# Altium PCB IoT-Button-PCB.PcbDoc (part 1 of 2)
Units mm, origin at the board's own origin, x right, y up, seen from the top; angles counter-clockwise.
Board outline 90 x 83 mm, 2 copper layers (Top Layer, Bottom Layer), stack 1.17 mm thick; 63 components, 30 nets, 232 pads, 64 vias.
Unrouted connection lines stored in the file: 71.
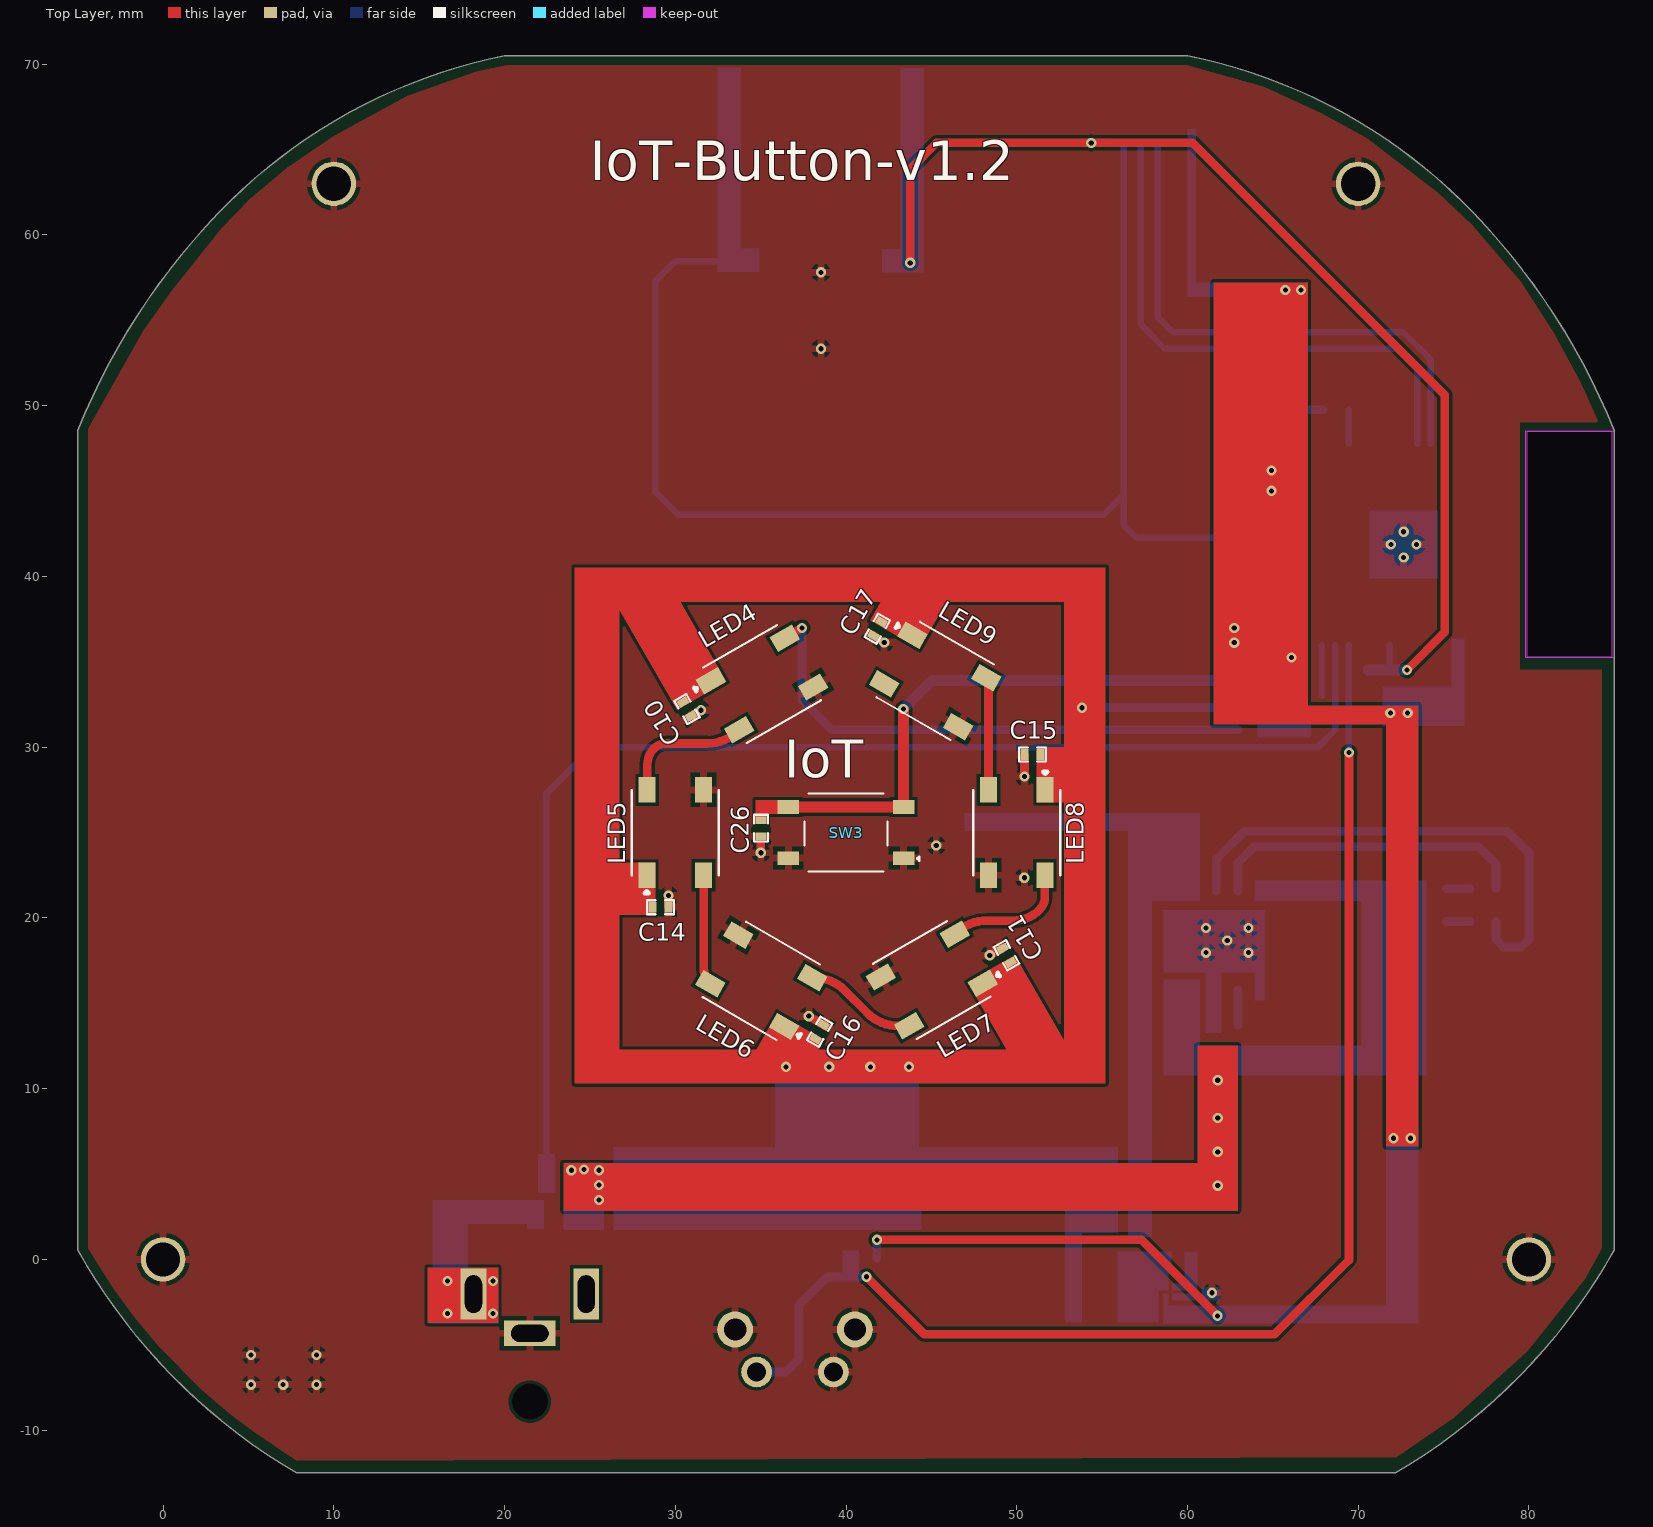
[diagram p0: Top Layer view]
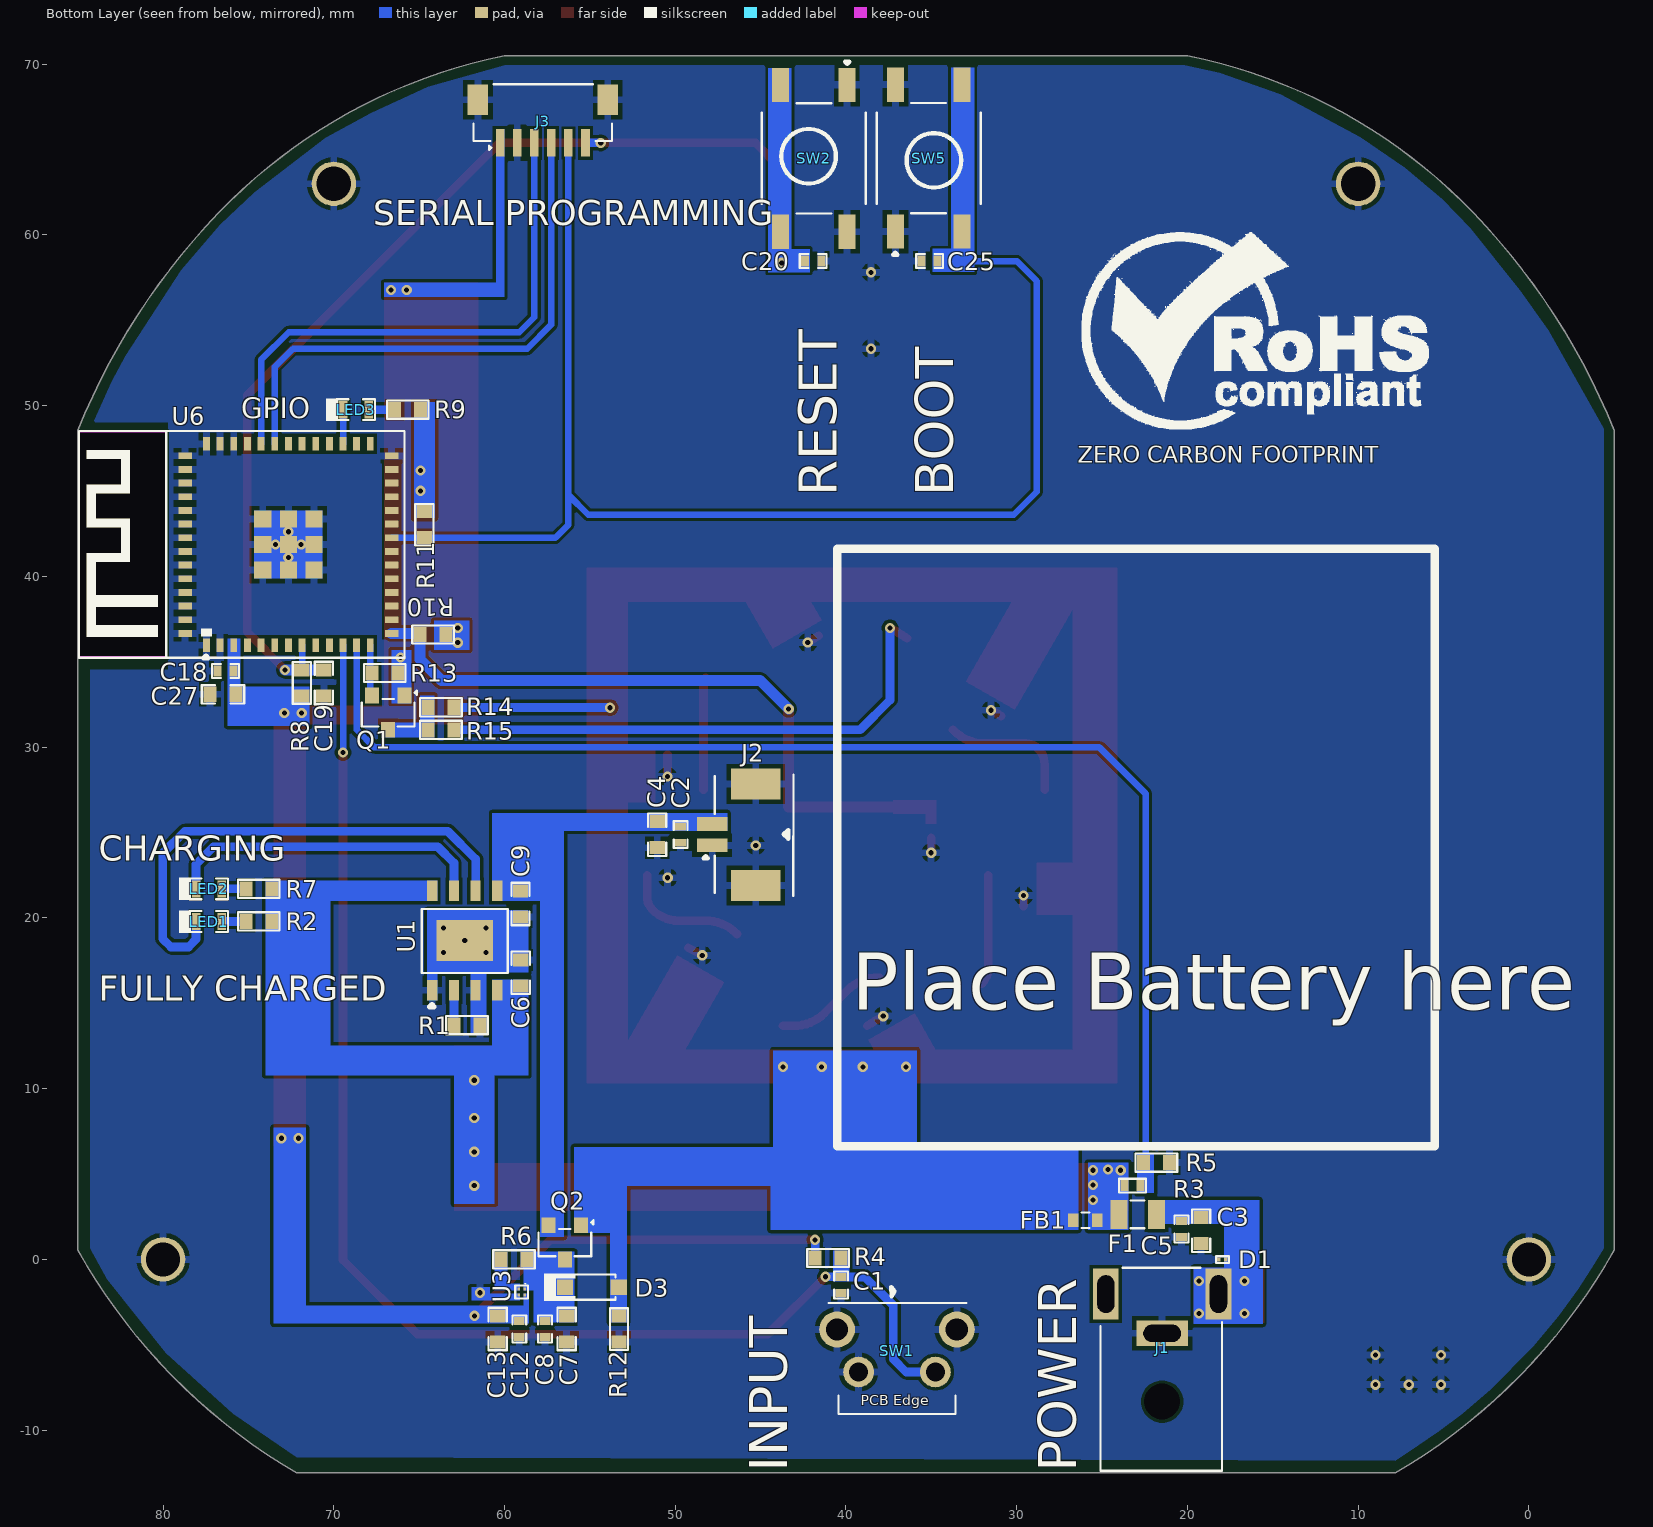
[diagram p1: Bottom Layer view, seen from below]
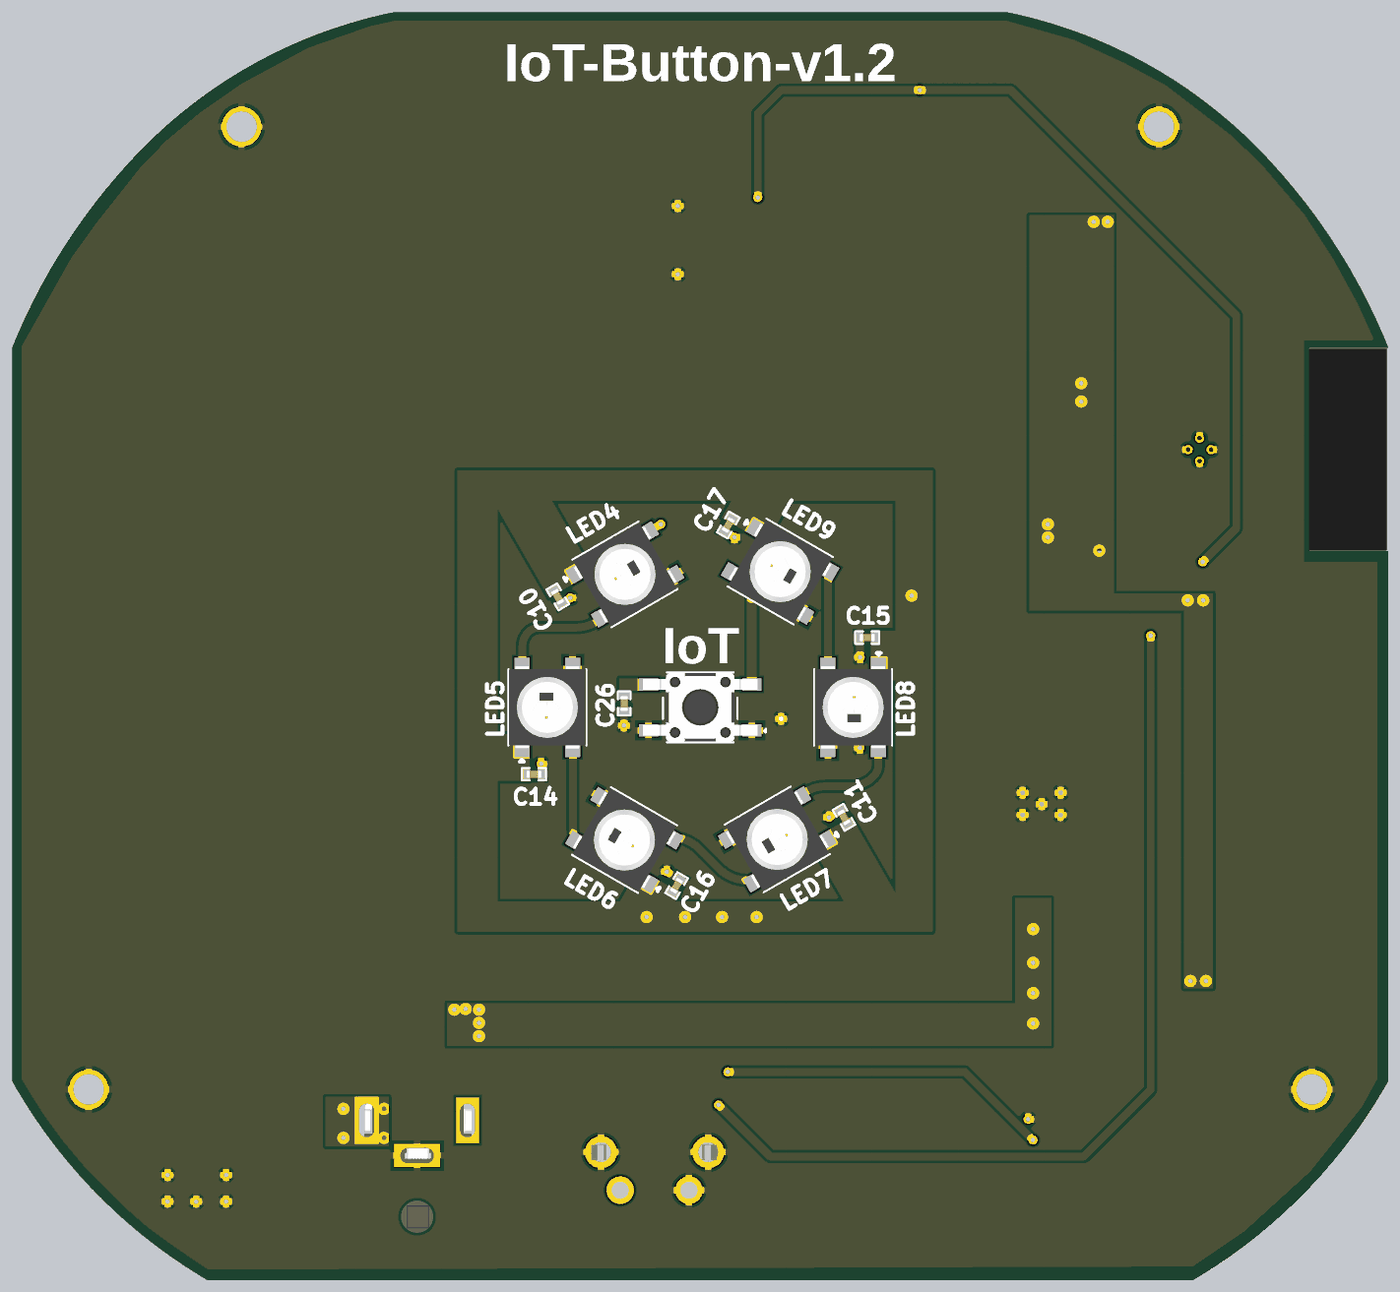
[diagram p2: 3D render of the assembled board from above, using the file's embedded part models]
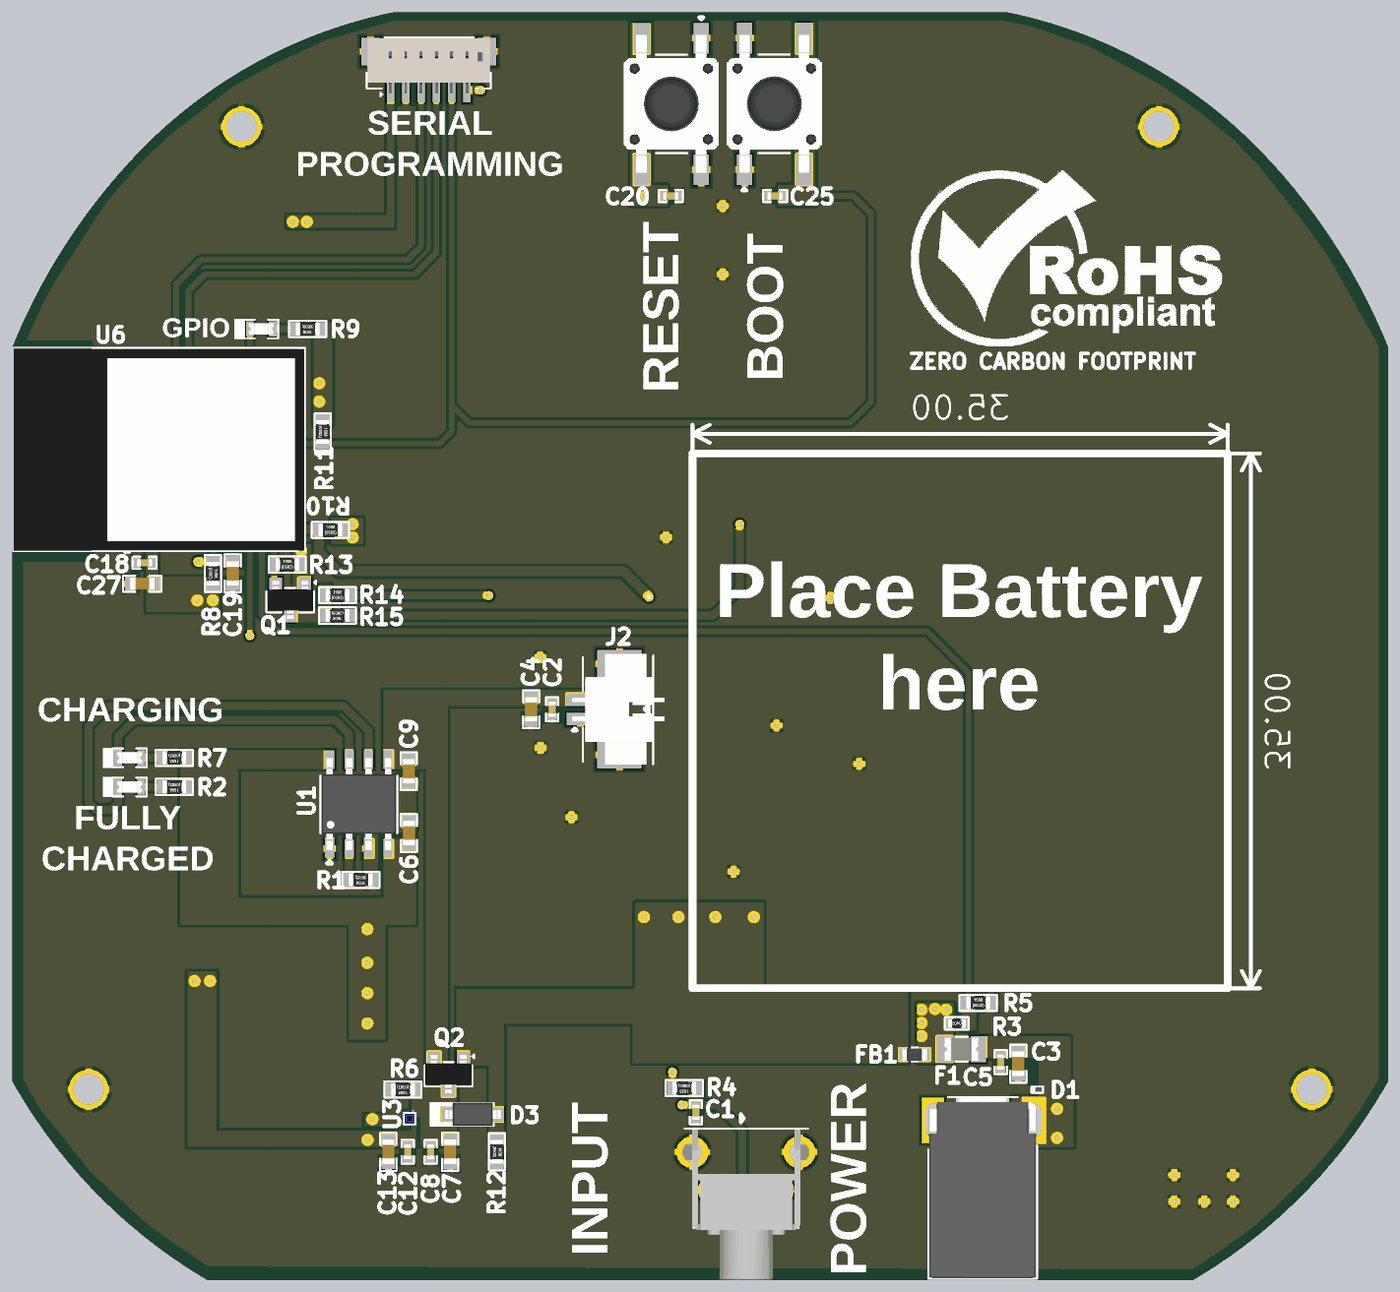
[diagram p3: 3D render of the assembled board from below, using the file's embedded part models]

## Layer stack, top to bottom
Top Solder: solder mask 0.01, Solder Resist, Dk 3.5
Top Layer: signal copper 0.035
Dielectric 1: dielectric 1.1, FR-4, Dk 4.8
Bottom Layer: signal copper 0.035
Bottom Solder: solder mask 0.01, Solder Resist, Dk 3.5

## Board outline
7.805,-12.5 cw(c25.512,17.69) -5,0.544 -5,48.544 cw(c32.1,33.591) 3.25,61.298 cw(c26.33,39.132) 20,70.5 60,70.5 cw(c53.67,39.132) 76.75,61.298 cw(c47.9,33.591) 85,48.544 85,0.544 cw(c54.488,17.69) 72.195,-12.5
cut-out: 79.812,35.224 79.812,48.535 85,48.544 85,35.235

## Design rules (kind name [scope] priority, off if disabled: settings)
Clearance [All] p1: gap=0.178 ignorepadtopadclearanceinfootprint=FALSE
HoleToHoleClearance [All] p1: gap=0.127 allowstackedmicrovias=TRUE
MinimumSolderMaskSliver [All] p1: minsoldermaskwidth=0
PolygonConnect [All] p1: connectstyle=Relief reliefconductorwidth=0.432 reliefentries=4 polygonreliefangle="90 Angle" airgapwidth=0.254
RoutingVias [All] p1: holewidth=0.3 width=0.6 viastyle="Through Hole" minholewidth=0.3 minwidth=0.6 maxholewidth=0.3 maxwidth=0.6
SilkToSilkClearance [All] p1: silktosilkclearance=0.051
SilkToSolderMaskClearance [IsPad] p1: minsilkscreentomaskgap=0 clearancetoexposedcopper=TRUE
SolderMaskExpansion [All] p1: expansion=0.102 istentingtop=FALSE
UnRoutedNet [All] p1: checkbadconnections=TRUE
Width [All] p1: maxlimit=1.2 minlimit=0.254 preferedwidth=0.508 minimp=50.000000 maximp=50.000000 favimp=50.000000
25 further rules are at their usual default settings.

## Classes and differential pairs
component class U_Power-Section: C2 C3 C4 C5 C6 C7 C8 C9 C12 C13 D1 D3 F1 FB1 J1 J2 LED1 LED2 Q2 R1 R2 R3 R5 R6 R7 R12 U1 U3
component class U_LEDS: C10 C11 C14 C15 C16 C17 LED4 LED5 LED6 LED7 LED8 LED9 Q1 R13 R14 R15
component class U_Controller-Section: C1 C18 C19 C20 C25 C26 C27 J3 LED3 R4 R8 R9 R10 R11 SW1 SW2 SW3 SW5 U6

## Components (designator, comment, footprint, x,y, rotation, side; value= is the part's Value field where it differs from the comment)
C1 "100nF" Cap-0402 40.284,-1.499 r90 bottom
C2 "100nF" Cap-0402 49.686,24.873 r90 bottom locked
C3 "1uF" Cap-0603 19.201,1.683 r90 bottom
C4 "1uF" Cap-0603 51.058,24.873 r90 bottom locked
C5 "100nF" Cap-0402 20.345,1.783 r90 bottom
C6 "10uF" Cap-0603 59.051,16.78 r270 bottom locked
C7 "1uF" Cap-0603 56.361,-4.083 r90 bottom locked
C8 "100nF" Cap-0402 57.631,-4.083 r90 bottom locked
C9 "10uF" Cap-0603 59.068,20.817 r90 bottom locked
C10 "100nF" Cap-0402 30.683,32.233 r120 top
C11 "100nF" Cap-0402 49.403,17.805 r300 top
C12 "100nF" Cap-0402 59.137,-4.082 r90 bottom locked
C13 "1uF" Cap-0603 60.4,-4.082 r90 bottom locked
C14 "100nF" Cap-0402 29.129,20.625 r180 top locked
C15 "100nF" Cap-0402 50.926,29.566 r0 top
C16 "100nF" Cap-0402 38.456,13.335 r240 top
C17 "100nF" Cap-0402 41.837,36.936 r60 top
C18 "100nF" Cap-0402 76.338,34.462 r180 bottom locked
C19 "1uF" Cap-0603 70.585,33.763 r270 bottom locked
C20 "100nF" Cap-0402 41.923,58.471 r0 bottom
C25 "100nF" Cap-0402 35.103,58.471 r180 bottom
C26 "100nF" Cap-0402 35.025,25.254 r90 top locked
C27 "1uF" Cap-0603 76.493,33.097 r180 bottom locked
D1 "PESD5V0H1BSFYL" DSN0603-2 17.957,-0.019 r180 bottom locked
D3 "MBR120VLSFT3G" SOD-123 54.881,-1.627 r0 bottom locked
F1 "BSMD0805L-200" Fuse-0805 22.914,2.633 r0 bottom locked
FB1 "BLM18SG121TN1D" "IND-0603 (1608 Metric)" 25.984,2.286 r180 bottom
J1 "DC-0360-2.5" DC-0360-2.5 21.481,-4.331 r90 bottom locked
J2 "1.25-2PWB" 1.25-2PWB 46.562,24.873 r90 bottom locked
J3 "Voltlink Target" "Voltlink Target" 57.758,66.656 r180 bottom locked
LED1 "Emerald" LED-0603 77.318,19.787 r0 bottom locked
LED2 "RED" LED-0603 77.318,21.698 r0 bottom locked
LED3 "White" LED-0603 68.712,49.765 r0 bottom locked
LED4 "WS2812B-XF02/W" WS2812B-XF02/W 35.078,33.705 r30 top
LED5 "WS2812B-XF02/W" WS2812B-XF02/W 30,25 r90 top locked
LED6 "WS2812B-XF02/W" WS2812B-XF02/W 35.041,16.316 r150 top
LED7 "WS2812B-XF02/W" WS2812B-XF02/W 45.033,16.359 r210 top
LED8 "WS2812B-XF02/W" WS2812B-XF02/W 50,25 r270 top locked
LED9 "WS2812B-XF02/W" WS2812B-XF02/W 45.227,33.882 r330 top
Q1 "Si2302CDS" Sot-23 66.819,32.026 r0 bottom
Q2 "AO3401" SOT-23 56.468,0.997 r0 bottom locked
R1 "10K" Res-0603 62.203,13.715 r180 bottom locked
R2 "220R" Res-0603 74.395,19.793 r180 bottom locked
R3 "56k" Res-0402 23.216,4.318 r0 bottom value=56kR
R4 "10K" Res-0603 41.046,0.076 r180 bottom
R5 "100K" Res-0603 21.819,5.664 r0 bottom
R6 "10K" Res-0603 59.445,-0.004 r180 bottom locked
R7 "330R" Res-0603 74.395,21.698 r180 bottom locked
R8 "10K" Res-0603 71.876,33.763 r90 bottom locked
R9 "51R" Res-0603 65.674,49.765 r180 bottom locked
R10 "10K" Res-0603 64.186,36.601 r0 bottom
R11 "DNP" Res-0603 64.693,43.029 r90 bottom locked
R12 "100K" RES-0603 53.293,-4.083 r90 bottom locked
R13 "10K" Res-0603 67.012,34.347 r0 bottom
R14 "10K" Res-0603 63.729,32.338 r0 bottom
R15 "1K" Res-0603 63.729,31.013 r180 bottom
SW1 "1825027-8" 1825027-8 37.013,-5.353 r180 bottom locked
SW2 "K2-6639SP-C4SC-04" K2-6639SP-C4SC-04 41.89,64.49 r270 bottom locked
SW3 "GT-TC074E-H080-L1" GT-TC074E-H080-L1 40,25 r180 top locked
SW5 "K2-6639SP-C4SC-04" K2-6639SP-C4SC-04 35.152,64.497 r90 bottom locked
U1 "TP4056-42-ESOP8" ESOP-8 62.33,18.67 r90 bottom locked
U3 "TPS7A2133PYWDJ" "4-WCSP (0.63x0.63)" 59.008,-1.924 r270 bottom locked
U6 "ESP32-MINI-1-N4" ESP32-MINI-1-N4 72.662,41.867 r90 bottom locked

## Footprints (in the part's own frame and the unit in brackets; to place one, negate y for a bottom-side part, rotate by r counter-clockwise, add the part's x,y. Pads: shape width x height; smd on the part's side, far side on the other; paste and mask are expansions set on the pad)
1.25-2PWB [mm]
  rect 0.8x1.8 smd: 1(-0.625,1.275) 2(0.625,1.275)
  rect 1.8x2.9 smd: MP1(-2.975,-1.275) MP2(2.975,-1.275)
  silkscreen extent -3.6,-3.48 3.52,1.78, body extent -3.62,-4.24 3.62,1.81, height 3.5
"4-WCSP (0.63x0.63)" [mm]
  rect 0.165x0.165 smd: A1(-0.192,0.193) A2(0.158,0.193) B1(-0.192,-0.157) B2(0.158,-0.157)
  silkscreen extent -0.54,-0.37 0.36,0.39, body extent -0.32,-0.32 0.32,0.32, height 0.43
1825027-8 [mm]
  round 1.8 hole 1.1: 1(-2.25,-1.245) 2(2.25,-1.245)
  round 2.1 hole 1.3: 3(3.505,1.245) 4(-3.505,1.245)
  silkscreen extent -4.01,-3.71 4.06,2.79, body extent -4.18,-7.11 4.23,2.73, height 8
Cap-0402 [mil]
  rect 18x25 smd mask+2.36: 1(-18.5,0) 2(18.5,0)
  silkscreen extent -31,-16 31,16, body extent -20,-10 20,10, height 19
Cap-0603 [mil]
  rect 30x35 smd mask+2.36: 1(-30,0) 2(30,0)
  silkscreen extent -49,-21 49,21, body extent -32,-16 31,16, height 34
DC-0360-2.5 [mm]
  rect 1.5x3 hole 1 slot 2.2 at 90 deg mask+0.05: 2(0,0)
  rect 3x1.5 hole 1 slot 2.2 at 0 deg mask+0.05: 3(2.3,3.3) 4(2.3,-3.3)
  round 0 hole 2.1 unplated mask+0.05: MH(-4,0)
  silkscreen extent -8.05,-3.51 3.84,3.61, body extent -8.01,-3.45 3.79,3.56, height 9.65
DSN0603-2 [mm]
  rect 0.2x0.24 smd mask+0.055: 1(-0.2,0) 2(0.2,0)
  silkscreen extent -0.38,-0.2 0.38,0.2, body extent -0.3,-0.15 0.3,0.15, height 0.32
ESOP-8 [mm]
  rect 1.2x0.6 smd: 1(-2.909,1.905) 2(-2.909,0.635) 3(-2.909,-0.635) 4(-2.909,-1.905) 5(2.909,-1.905) 6(2.909,-0.635) 7(2.909,0.635) 8(2.909,1.905)
  rect 2.4x3.3 smd: 9(0,0)
  silkscreen extent -3.88,-2.51 1.85,2.51, body extent -3,-2.45 3,2.45, height 1.75
ESP32-MINI-1-N4 [mm]
  rect 0.8x0.4 smd: 1(-5.9,4.8) 2(-5.9,4) 3(-5.9,3.2) 4(-5.9,2.4) 5(-5.9,1.6) 6(-5.9,0.8) 7(-5.9,0) 8(-5.9,-0.8) 9(-5.9,-1.6) 10(-5.9,-2.4) 11(-5.9,-3.2) 12(-5.9,-4) 13(-5.9,-4.8) 28(5.9,-4.8) 29(5.9,-4) 30(5.9,-3.2) 31(5.9,-2.4) 32(5.9,-1.6) 33(5.9,-0.8) 34(5.9,0) 35(5.9,0.8) 36(5.9,1.6) 37(5.9,2.4) 38(5.9,3.2) 39(5.9,4) 40(5.9,4.8)
  rect 0.4x0.8 smd: 14(-5.2,-6.05) 15(-4.4,-6.05) 16(-3.6,-6.05) 17(-2.8,-6.05) 18(-2,-6.05) 19(-1.2,-6.05) 20(-0.4,-6.05) 21(0.4,-6.05) 22(1.2,-6.05) 23(2,-6.05) 24(2.8,-6.05) 25(3.6,-6.05) 26(4.4,-6.05) 27(5.2,-6.05) 41(5.2,6.05) 42(4.4,6.05) 43(3.6,6.05) 44(2.8,6.05) 45(2,6.05) 46(1.2,6.05) 47(0.4,6.05) 48(-0.4,6.05) 49(-1.2,6.05) 50(-2,6.05) 51(-2.8,6.05) 52(-3.6,6.05) 53(-4.4,6.05) 54(-5.2,6.05)
  rect 1x1 smd: 55(-1.5,1.5) 56(0,1.5) 57(1.5,1.5) 58(-1.5,0) 59(0,0) 60(1.5,0) 61(-1.5,-1.5) 62(0,-1.5) 63(1.5,-1.5)
  Keep-Out Layer region: -6.579,12.217 6.604,12.217 6.604,7.213 -6.579,7.213
  silkscreen extent -6.65,-6.81 6.65,12.27, body extent -6.6,-6.76 6.6,12.24, height 3.25
Fuse-0805 [mm]
  rect 1x1.7 smd: 1(-1.1,0) 2(1.1,0)
  silkscreen extent -0.41,-0.81 0.41,0.81, body extent -1.1,-0.75 1.1,0.75, height 1.24
GT-TC074E-H080-L1 [mm]
  rect 1.25x0.8 smd: 1(-3.375,1.5) 2(3.375,1.5) 3(-3.375,-1.5) 4(3.375,-1.5)
  silkscreen extent -4.29,-2.29 2.44,2.29, body extent -3.75,-2.25 3.75,2.25, height 8
"IND-0603 (1608 Metric)" [mm] "0.063\" L x 0.032\" W (1.60mm x 0.80mm)"
  rect 0.6x0.8 smd: 1(-0.7,0) 2(0.7,0)
  silkscreen extent -0.2,-0.46 0.23,0.46, body extent -0.8,-0.4 0.8,0.4, height 0.78
K2-6639SP-C4SC-04 [mm]
  rect 2x1 smd: 1(-4.3,1.95) 2(4.3,1.95) 3(-4.3,-1.95) 4(4.3,-1.95)
  silkscreen extent -5.66,-3.05 3.23,3.05, body extent -4.5,-3 4.5,3, height 5
LED-0603 [mm]
  rect 0.5x1 smd: 1(-0.75,0) 2(0.75,0)
  silkscreen extent -1.12,-0.66 1.75,0.66, body extent -0.82,-0.37 0.82,0.36, height 0.68
Res-0402 [mil]
  rect 18x25 smd mask+2.17: 1(-18.5,0) 2(18.5,0)
  silkscreen extent -32,-17 32,16, body extent -23,-11 23,11, height 16
Res-0603 [mil]
  rect 30x35 smd: 1(-30,0) 2(30,0)
  silkscreen extent -48,-21 48,21, body extent -31,-17 31,17, height 18
RES-0603 [mil]
  rect 30x35 smd: 1(-30,0) 2(30,0)
  silkscreen extent -48,-21 48,21, body extent -31,-17 31,17, height 18
SOD-123 [mm]
  rect 0.95x0.9 smd: 1(-1.575,0) 2(1.575,0)
  silkscreen extent -1.37,-0.8 2.82,0.8, body extent -1.82,-0.77 1.83,0.78, height 1.5
Sot-23 [mm] "TRANS NPN 40V 0.6A SOT23"
  rect 0.82x0.92 smd: 1(-0.95,-1) 2(0.95,-1) 3(0,1)
  silkscreen extent -1.68,-1.3 1.55,0.81, body extent -1.5,-1.25 1.5,1.25, height 1.05
SOT-23 [mm] "TRANS NPN 40V 0.6A SOT23"
  rect 0.82x0.92 smd: 1(-0.95,-1) 2(0.95,-1) 3(0,1)
  silkscreen extent -1.68,-1.3 1.55,0.81, body extent -1.5,-1.25 1.5,1.25, height 1.05
"Voltlink Target" [mm]
  rect 0.5x1.6 smd: 1(-2.5,-1.262) 2(-1.5,-1.262) 3(-0.5,-1.262) 4(0.5,-1.262) 5(1.5,-1.262) 6(2.5,-1.262)
  rect 1.2x1.8 smd: MP1(-3.8,1.262) MP2(3.8,1.262)
  silkscreen extent -4.06,-1.68 4.06,2.17, body extent -4,-1.49 4,2.11, height 4.25
WS2812B-XF02/W [mm]
  rect 1.5x1 smd: 1(-2.5,1.65) 2(-2.5,-1.65) 3(2.5,-1.65) 4(2.5,1.65)
  silkscreen extent -3.56,-2.55 2.5,2.55, body extent -2.7,-2.5 2.7,2.5, height 1.55

## Part data
C1 C2 C5 C8 C10 C11 C12 C14 C15 C16 C17 C18 C20 C25 C26: library part CC0402KRX5R8BB104, "CAP CER 0.1UF 25V X5R 0402", Case Code (Imperial)=0402, Case Code (Metric)=1005, Dielectric=X5R, LCSC Part Number=C106256, Manufacturer=Yageo, Max Operating Temperature=85°C, Min Operating Temperature=-55°C, Resistor Type=Ceramic, Supplier Part Number 1=311-1697-1-ND, Tolerance=10%, Voltage Rating=25V, Capacitance=100nF, Case/Package=0402, Category="Ceramic Capacitors", ComponentLink1Description=http://www.mouser.com/ds/2/447/UPY-GPHC_X5R_4V-to-50V_25-1131599.pdf?src-supplier=Mouser, ComponentLink1URL=http://www.mouser.com/ds/2/447/UPY-GPHC_X5R_4V-to-50V_25-1131599.pdf?src-supplier=Mouser, ComponentLink2Description=http://www.yageo.com/documents/recent/UPY-GPHC_X5R_4V-to-50V-16.pdf?src-supplier=Future+Electronics, ComponentLink2URL=http://www.yageo.com/documents/recent/UPY-GPHC_X5R_4V-to-50V-16.pdf?src-supplier=Future+Electronics, ComponentLink3Description=http://www.yageo.com/documents/recent/UPY-GPHC_X5R_4V-to-50V_25.pdf?src-supplier=Digi-Key, ComponentLink3URL=http://www.yageo.com/documents/recent/UPY-GPHC_X5R_4V-to-50V_25.pdf?src-supplier=Digi-Key, Depth=0.5mm, Halogen Free="Halogen Free", Item Type=Capacitor, Lead Free="Lead Free", Length=0.039inch, Manufacturer Part Number=CC0402KRX5R8BB104, Mount="Surface Mount", Packaging="Tape and Reel", Pricing 1="1=0.10000, 10=0.03800, 50=0.02100, 100=0.01710, 500=0.01224, 1000=0.00961, 2500=0.00874, 5000=0.00804 (USD)", RoHS=Yes, RoHS Compliant=Yes, Series=CC, Stock 1=4598218, Supplier 1=Digi-Key, Thickness=0.022inch, Voltage Rating (DC)=25V, Width=0.02inch
C3 C4 C7 C13 C19 C27: library part CC0603KRX5R8BB105, "CAP CER 1UF 25V X5R 0603", Case Code (Imperial)=0603, Case Code (Metric)=1608, Dielectric=X5R, LCSC Part Number=C14664, Manufacturer=Yageo, Max Operating Temperature=85°C, Min Operating Temperature=-55°C, Package Quantity=1, Supplier Part Number 1=311-1445-1-ND, Tolerance=10%, Voltage Rating=25V, Capacitance=1uF, Case/Package=0603, Category="Ceramic Capacitors", ComponentLink1Description=https://datasheet.ciiva.com/176/mlccorderingcode-176785.pdf?src-supplier=Digi-Key, ComponentLink1URL=https://datasheet.ciiva.com/176/mlccorderingcode-176785.pdf?src-supplier=Digi-Key, ComponentLink2Description=https://datasheet.ciiva.com/176/mlccorderingcode-176786.pdf?src-supplier=Digi-Key, ComponentLink2URL=https://datasheet.ciiva.com/176/mlccorderingcode-176786.pdf?src-supplier=Digi-Key, ComponentLink3Description=https://datasheet.ciiva.com/176/mlccorderingcode-176787.pdf?src-supplier=Digi-Key, ComponentLink3URL=https://datasheet.ciiva.com/176/mlccorderingcode-176787.pdf?src-supplier=Digi-Key, ComponentLink4Description=https://datasheet.ciiva.com/17436/upy-gphc-x5r-4v-to-50v-12-17436952.pdf?src-supplier=Avnet+Europe, ComponentLink4URL=https://datasheet.ciiva.com/17436/upy-gphc-x5r-4v-to-50v-12-17436952.pdf?src-supplier=Avnet+Europe, ComponentLink5Description=https://datasheet.ciiva.com/7978/1525783-7978171.pdf?src-supplier=Element14, ComponentLink5URL=https://datasheet.ciiva.com/7978/1525783-7978171.pdf?src-supplier=Element14, ComponentLink6Description=https://datasheet.ciiva.com/11586/upy-gphc-x5r-4v-to-50v-12-11586318.pdf?src-supplier=Avnet, ComponentLink6URL=https://datasheet.ciiva.com/11586/upy-gphc-x5r-4v-to-50v-12-11586318.pdf?src-supplier=Avnet, Construction=Flat, Depth=0.8mm, Halogen Free="Halogen Free", Height=0.8mm, Lead Free="Lead Free", Length=1.6mm, Manufacturer Part Number=CC0603KRX5R8BB105, Mount="Surface Mount", Number of Pins=2, Packaging="Tape and Reel", Pricing 1="1=0.12000, 10=0.08400, 50=0.04760, 100=0.03940, 500=0.02764, 1000=0.02288 (USD)", Radiation Hardening=No, REACH SVHC="No SVHC", RoHS=Yes, RoHS Compliant=Yes, Series=CC, Stock 1=919939, Supplier 1=Digi-Key, Termination=SMD/SMT, Thickness=0.035inch, Voltage Rating (DC)=25V, Width=0.031inch
  C3 C4 C7 C13: Item Type=Capacitor
C6 C9: library part CC0603KRX5R7BB106, "CAP CER 10UF 16V X5R 0603", Case Code (Imperial)=0603, Case Code (Metric)=1608, LCSC Part Number=C2936601, Manufacturer=Yageo, Max Operating Temperature=85°C, Min Operating Temperature=-55°C, Supplier Part Number 1=311-3486-1-ND, Tolerance=10%, Voltage Rating=16V, Capacitance=10uF, Case/Package=0603, Category="Ceramic Capacitors", ComponentLink1Description=http://www.yageo.com/documents/recent/UPY-GPHC_X5R_4V-to-50V_25.pdf?src-supplier=Digi-Key, ComponentLink1URL=http://www.yageo.com/documents/recent/UPY-GPHC_X5R_4V-to-50V_25.pdf?src-supplier=Digi-Key, Item Type=Capacitor, Manufacturer Part Number=CC0603KRX5R7BB106, Mount="Surface Mount", Packaging="Cut Tape", Pricing 1="1=0.68000, 10=0.48000, 50=0.36300, 100=0.31610, 500=0.23416, 1000=0.19903 (USD)", RoHS=Yes, RoHS Compliant=Yes, Stock 1=240725, Supplier 1=Digi-Key
D1: "TVS DIODE 5VWM 6.3VC DSN0603-2", LCSC Part Number=C477989, Manufacturer=Nexperia, Category="ESD and Circuit Protection ICs", ComponentLink1Description=http://www.farnell.com/datasheets/1961312.pdf?src-supplier=Farnell, ComponentLink1URL=http://www.farnell.com/datasheets/1961312.pdf?src-supplier=Farnell, ComponentLink2Description=https://assets.nexperia.com/documents/data-sheet/PESD5V0H1BSF.pdf?src-supplier=Digi-Key, ComponentLink2URL=https://assets.nexperia.com/documents/data-sheet/PESD5V0H1BSF.pdf?src-supplier=Digi-Key, ComponentLink3Description=http://www.farnell.com/datasheets/1961312.pdf?src-supplier=Newark, ComponentLink3URL=http://www.farnell.com/datasheets/1961312.pdf?src-supplier=Newark, Item Type=Diode, Manufacturer Part Number=PESD5V0H1BSFYL, Pricing 1="18000=0.06453, 36000=0.06278, 54000=0.06104, 90000=0.05930, 180000=0.05755, 900000=0.05581, 1800000=0.05406 (USD)", RoHS=Yes, RoHS Compliant=Yes, Stock 1=9000, Supplier 1=Avnet, Supplier Part Number 1=PESD5V0H1BSFYL
D3: "DIODE SCHOTTKY 20V 1A SOD123FL", Average Rectified Current=1A, Forward Voltage=340mV, LCSC Part Number=C295749, Manufacturer="ON Semiconductor", Max Forward Surge Current (Ifsm)=45A, Max Operating Temperature=125°C, Max Repetitive Reverse Voltage (Vrrm)=20V, Max Reverse Leakage Current=600uA, Min Operating Temperature=-65°C, Package Quantity=10000, Supplier Part Number 1=MBR120VLSFT3GOSCT-ND, ComponentLink1Description=http://www.mouser.com/ds/2/308/MBR120VLSFT1-D-107081.pdf?src-supplier=Mouser, ComponentLink1URL=http://www.mouser.com/ds/2/308/MBR120VLSFT1-D-107081.pdf?src-supplier=Mouser, ComponentLink2Description=http://www.onsemi.com/pub/Collateral/MBR120VLSFT1-D.PDF?src-supplier=Digi-Key, ComponentLink2URL=http://www.onsemi.com/pub/Collateral/MBR120VLSFT1-D.PDF?src-supplier=Digi-Key, ComponentLink3Description=http://www.onsemi.cn/pub_link/Collateral/MBR120VLSFT1-D.PDF?src-supplier=Avnet, ComponentLink3URL=http://www.onsemi.cn/pub_link/Collateral/MBR120VLSFT1-D.PDF?src-supplier=Avnet, Current Rating=1A, Element Configuration=Single, Forward Current=1A, Halogen Free="Halogen Free", Lead Free="Lead Free", Manufacturer Part Number=MBR120VLSFT3G, Max Reverse Voltage (DC)=20V, Max Surge Current=45A, Number of Pins=2, Output Current=1A, Packaging="Tape and Reel", Peak Non-Repetitive Surge Current=45A, Peak Reverse Current=600uA, Polarity=Standard, Pricing 1="1=0.42, 10=0.338, 100=0.2298, 500=0.17234, 1000=0.12926 (USD)", Radiation Hardening=No, REACH SVHC="No SVHC", Stock 1=130499, Supplier 1=Digi-Key, Voltage Rating (DC)=20V
F1: "6V 2A 50A 1W -40℃~+85℃ 4A 4mΩ 5s 45mΩ 0805 Resettable Fuses ROHS", LCSC Part Number=C2757931, Manufacturer=BHFUSE, Package=0805, ComponentLink1Description=LCSC, ComponentLink1URL=https://www.lcsc.com/product-detail/Resettable-Fuses_BHFUSE-BSMD0805L-200_C2757931.html, Item Type=Fuse, Manufacturer Part Number=BSMD0805L-200
FB1: "FERRITE BEAD 120 OHM 0603 1LN", Case Code (Imperial)=0603, Case Code (Metric)=1608, Current Rating=3A, DC Resistance (DCR)=25mR, Frequency=100MHz, LCSC Part Number=C113030, Manufacturer=Murata, Max Operating Temperature=125°C, Min Operating Temperature=-55°C, Package Quantity=1, Tolerance=25%, Case/Package=0603, Category="Ferrite Beads and Chips", ComponentLink1Description=https://datasheet.ciiva.com/1012/l0110s0100blm18s-1012624.pdf?src-supplier=Digi-Key, ComponentLink1URL=https://datasheet.ciiva.com/1012/l0110s0100blm18s-1012624.pdf?src-supplier=Digi-Key, ComponentLink2Description=https://datasheet.ciiva.com/11799/0900766b811b5866-11799181.pdf?src-supplier=RSComponents, ComponentLink2URL=https://datasheet.ciiva.com/11799/0900766b811b5866-11799181.pdf?src-supplier=RSComponents, ComponentLink3Description=https://datasheet.ciiva.com/18093/getdatasheetpartid-295885-18093249.pdf?src-supplier=Verical, ComponentLink3URL=https://datasheet.ciiva.com/18093/getdatasheetpartid-295885-18093249.pdf?src-supplier=Verical, ComponentLink4Description=https://datasheet.ciiva.com/41449/001171723-da-01-en-chip-drossel0603-120r-3000ma-1-6x0-8mm-41449353.pdf?src-supplier=Conrad, ComponentLink4URL=https://datasheet.ciiva.com/41449/001171723-da-01-en-chip-drossel0603-120r-3000ma-1-6x0-8mm-41449353.pdf?src-supplier=Conrad, ComponentLink5Description=https://datasheet.ciiva.com/41449/001172312-da-01-en-drossel-0603-120r-1-6x0-8mm-10000st-41449675.pdf?src-supplier=Conrad, ComponentLink5URL=https://datasheet.ciiva.com/41449/001172312-da-01-en-drossel-0603-120r-1-6x0-8mm-10000st-41449675.pdf?src-supplier=Conrad, ComponentLink6Description=https://datasheet.ciiva.com/8021/5151-8021511.pdf?src-supplier=Element14, ComponentLink6URL=https://datasheet.ciiva.com/8021/5151-8021511.pdf?src-supplier=Element14, ComponentLink7Description=https://datasheet.ciiva.com/8021/5151-8021512.pdf?src-supplier=Element14, ComponentLink7URL=https://datasheet.ciiva.com/8021/5151-8021512.pdf?src-supplier=Element14, ComponentLink8Description=https://datasheet.ciiva.com/14122/blm-series-eng-tds-14122906.pdf?src-supplier=Distrelec, ComponentLink8URL=https://datasheet.ciiva.com/14122/blm-series-eng-tds-14122906.pdf?src-supplier=Distrelec, ComponentLink9Description=https://datasheet.ciiva.com/1012/l0110s0100blm18s-1012623.pdf?src-supplier=Digi-Key, ComponentLink9URL=https://datasheet.ciiva.com/1012/l0110s0100blm18s-1012623.pdf?src-supplier=Digi-Key, ComponentLink10Description=https://datasheet.ciiva.com/1012/l0110s0100blm18s-1012625.pdf?src-supplier=Digi-Key, ComponentLink10URL=https://datasheet.ciiva.com/1012/l0110s0100blm18s-1012625.pdf?src-supplier=Digi-Key, ComponentLink11Description=https://datasheet.ciiva.com/16395/l0110s0100blm18s-16395498.pdf?src-supplier=Future+Electronics, ComponentLink11URL=https://datasheet.ciiva.com/16395/l0110s0100blm18s-16395498.pdf?src-supplier=Future+Electronics, Core Material=Ferrite, DC Resistance-Max=25mR, Depth=0.8mm, Height=0.8mm, Impedance=120R, Item Type="Ferrite Bead", Lead Free="Lead Free", Length=1.6mm, Manufacturer Part Number=BLM18SG121TN1D, Material=Steel,Ferrite, Max Current Rating=3A, Max DC Current=3A, Number of Circuits=1, Number of Lines=1, Number of Pins=2, Packaging="Tape and Reel", Pricing 1="1=0.12640, 10=0.08350, 25=0.07210, 100=0.05150, 250=0.04730, 500=0.04110, 1000=0.03420, 3000=0.03360, 6000=0.03320, 15000=0.03270, 30000=0.03200, 75000=0.03150 (USD)", Reach SVHC Compliant=Yes, RoHS=Yes, RoHS Compliant=Yes, Series=BLM18S, Shielding=Unshielded, Stock 1=82612, Supplier 1="Arrow Electronics", Supplier Part Number 1=BLM18SG121TN1D, Termination=SMD/SMT, Test Frequency=100MHz, Width=0.8mm
J1: "DC Power Receptacle 260℃ Brass -20℃~+70℃ 2.5mm 6mm 2.5A 24V Plugin AC/DC Power Connectors ROHS", LCSC Part Number=C319122, Manufacturer="XKB Connectivity", Package=Plugin, ComponentLink1Description=LCSC, ComponentLink1URL=https://www.lcsc.com/product-detail/AC-DC-Power-Connectors_XKB-Connectivity-DC-0360-2-5_C319122.html, Item Type="DC Jack", Manufacturer Part Number=DC-0360-2.5
J2: "1x2P 1 1.25mm Male pin 2 -40℃~+85℃ Surface Mount SMD,P=1.25mm Wire To Board / Wire To Wire Connector ROHS", LCSC Part Number=C2905009, Manufacturer=DEALON, Package=SMD,P=1.25mm, ComponentLink1Description=LCSC, ComponentLink1URL=https://www.lcsc.com/product-detail/Wire-To-Board-Wire-To-Wire-Connector_DEALON-1-25-2PWB_C2905009.html, Item Type="JST Connector", Manufacturer Part Number=1.25-2PWB
J3: library part C145963, "1x6P SH 1 1mm 6 SMD,P=1mm Wire To Board / Wire To Wire Connector ROHS", Manufacturer=BOOMELE, Package=SMD,P=1mm, ComponentLink1Description=LCSC, ComponentLink1URL=https://www.lcsc.com/product-detail/Wire-To-Board-Wire-To-Wire-Connector_BOOMELE-Boom-Precision-Elec-C145963_C145963.html, Item Type=Connector, LCSC Part Number=C145963, Manufacturer Part Number=C145963
LED1: library part NCD0603G2, "Emerald 0603 Light Emitting Diodes (LED) ROHS", LCSC Part Number=C87326, Manufacturer="Foshan NationStar Optoelectronics", Package=0603, ComponentLink1Description=LCSC, ComponentLink1URL=https://www.lcsc.com/product-detail/Light-Emitting-Diodes-LED_Foshan-NationStar-Optoelectronics-NCD0603G2_C87326.html, Item Type=LED, Manufacturer Part Number=NCD0603G2
LED2: library part NCD0603R3, "0603 Light Emitting Diodes (LED) ROHS", LCSC Part Number=C3151730, Manufacturer="Foshan NationStar Optoelectronics", Package=0603, ComponentLink1Description=LCSC, ComponentLink1URL=https://www.lcsc.com/product-detail/Light-Emitting-Diodes-LED_Foshan-NationStar-Optoelectronics-NCD0603R3_C3151730.html, Item Type=LED, Manufacturer Part Number=NCD0603R3
LED3: library part NCD0603W3, "White light 0603 Light Emitting Diodes (LED) ROHS", LCSC Part Number=C158100, Manufacturer="Foshan NationStar Optoelectronics", Package=0603, ComponentLink1Description=LCSC, ComponentLink1URL=https://www.lcsc.com/product-detail/Light-Emitting-Diodes-LED_Foshan-NationStar-Optoelectronics-NCD0603W3_C158100.html, Item Type=LED, Manufacturer Part Number=NCD0603W3
LED4 LED5 LED6 LED7 LED8 LED9: "SMD5050 Light Emitting Diodes (LED) ROHS", LCSC Part Number=C4154882, Manufacturer=Worldsemi, Package=SMD5050, ComponentLink1Description=LCSC, ComponentLink1URL=https://www.lcsc.com/product-detail/Light-Emitting-Diodes-LED_Worldsemi-WS2812B-XF02-W_C4154882.html, Item Type="RGB LED", Manufacturer Part Number=WS2812B-XF02/W
Q1: "N-CHANNEL 20-V (D-S) MOSFET", LCSC Part Number=C5310968, Manufacturer="TECH PUBLIC", Manufacturer Part Number=SI2302CDS, Package=SOT-23, ComponentLink1Description=LCSC, ComponentLink1URL=https://www.lcsc.com/product-detail/MOSFETs_TECH-PUBLIC-SI2302CDS_C5310968.html, Item Type=Mosfet
Q2: "Trans Mosfet P-ch 30V 4A 3-PIN SOT-23 T/r", Case/Package=TO-236-3, Continuous Drain Current (ID)=4A, Drain to Source Voltage (Vdss)=30V, Input Capacitance=1.2nF, LCSC Part Number=C181091, Manufacturer="Alpha & Omega Semiconductor", Manufacturer Part Number=AO3401A, Max Operating Temperature=150°C, Max Power Dissipation=1.4W, Min Operating Temperature=-55°C, Category=MOSFETs, ComponentLink1Description=https://datasheet.ciiva.com/940/ao3401a-940720.pdf?src-supplier=Digi-Key, ComponentLink1URL=https://datasheet.ciiva.com/940/ao3401a-940720.pdf?src-supplier=Digi-Key, ComponentLink2Description=https://datasheet.ciiva.com/26927/getdatasheetpartid-79048-26927888.pdf?src-supplier=Verical, ComponentLink2URL=https://datasheet.ciiva.com/26927/getdatasheetpartid-79048-26927888.pdf?src-supplier=Verical, Item Type=Mosfet, Lead Free="Lead Free", Mount="Surface Mount", Number of Elements=1, Number of Pins=3, Packaging="Tape and Reel", Power Dissipation=1.4W, Radiation Hardening=No, Rds On Max=44mR, RoHS=Yes, RoHS Compliant=Yes, Series=-, Supplier 1="Arrow Electronics", Supplier Part Number 1=AO3401A
R1 R4 R6 R8 R10 R11 R13 R14: library part RC0603FR-0710KL, "RES SMD 10K Ohm 1% 1/10W 0603", Case Code (Imperial)=0603, Case Code (Metric)=1608, LCSC Part Number=C98220, Manufacturer=Yageo, Max Operating Temperature=155°C, Max Power Dissipation=100mW, Min Operating Temperature=-55°C, Resistance=10kR, Resistance Tolerance=1%, Resistor Type="Thick Film", Supplier Part Number 1=311-10.0KHRCT-ND, Temperature Coefficient=100ppm/°C, Voltage Rating=75V, Voltage Rating (DC)=50V, Case/Package=0603, Category="Chip SMD Resistors", ComponentLink1Description=https://datasheet.ciiva.com/7660/38590-7660789.pdf?src-supplier=Element14, ComponentLink1URL=https://datasheet.ciiva.com/7660/38590-7660789.pdf?src-supplier=Element14, ComponentLink2Description=https://datasheet.ciiva.com/7983/443971-7983596.pdf?src-supplier=Element14, ComponentLink2URL=https://datasheet.ciiva.com/7983/443971-7983596.pdf?src-supplier=Element14, ComponentLink3Description=https://datasheet.ciiva.com/22747/443971-22747519.pdf?src-supplier=Element14, ComponentLink3URL=https://datasheet.ciiva.com/22747/443971-22747519.pdf?src-supplier=Element14, ComponentLink4Description=https://datasheet.ciiva.com/46440/1868787-46440891.pdf?src-supplier=Element14, ComponentLink4URL=https://datasheet.ciiva.com/46440/1868787-46440891.pdf?src-supplier=Element14, ComponentLink5Description=https://datasheet.ciiva.com/7746/1738695-7746239.pdf?src-supplier=Element14, ComponentLink5URL=https://datasheet.ciiva.com/7746/1738695-7746239.pdf?src-supplier=Element14, ComponentLink6Description=https://datasheet.ciiva.com/15189/getdatasheetpartid-409289-15189591.pdf?src-supplier=Verical, ComponentLink6URL=https://datasheet.ciiva.com/15189/getdatasheetpartid-409289-15189591.pdf?src-supplier=Verical, Construction=Rectangular, Depth=0.8mm, Features="Moisture Resistant", Height=0.45mm, Item Type=Resistor, Lead Free="Lead Free", Lead Pitch=0.3mm, Length=1.6mm, Manufacturer Part Number=RC0603FR-0710KL, Military Standard=Not, Number of Pins=2, Number of Terminations=2, Packaging="Tape and Reel", Power Rating=100mW, Pricing 1="1=0.10000, 10=0.02400, 100=0.00970, 1000=0.00436, 2500=0.00378 (USD)", REACH SVHC=Unknown, RoHS=Yes, RoHS Compliant=Yes, Series=RC, Size Code=0603, Stock 1=25249139, Supplier 1=Digi-Key, Termination=SMD/SMT, Tolerance=1%, Weight=7.1E-05oz, Width=0.8mm
R2: library part RC0603FR-07220RL, "RES SMD 220 OHM 1% 1/10W 0603", Case Code (Imperial)=0603, Case Code (Metric)=1608, LCSC Part Number=C107696, Manufacturer=Yageo, Max Operating Temperature=155°C, Max Power Dissipation=100mW, Min Operating Temperature=-55°C, Package Quantity=1, Supplier Part Number 1=311-220HRCT-ND, Temperature Coefficient=100ppm/°C, Tolerance=1%, Voltage Rating=50V, Case/Package=0603, ComponentLink1Description=http://www.yageo.com/documents/recent/PYu-RC_Group_51_RoHS_L_10.pdf?src-supplier=Digi-Key, ComponentLink1URL=http://www.yageo.com/documents/recent/PYu-RC_Group_51_RoHS_L_10.pdf?src-supplier=Digi-Key, ComponentLink2Description=http://www.farnell.com/datasheets/1868787.pdf?src-supplier=Element14, ComponentLink2URL=http://www.farnell.com/datasheets/1868787.pdf?src-supplier=Element14, Composition="Thick Film", Depth=0.8mm, Features="Moisture Resistant", Height=0.022inch, Lead Free="Lead Free", Length=1.6mm, Manufacturer Part Number=RC0603FR-07220RL, Military Standard=Not, Number of Pins=2, Number of Terminations=2, Packaging="Tape and Reel", Power Rating=100mW, Pricing 1="1=0.1, 10=0.023, 100=0.0094, 1000=0.00421, 2500=0.00366 (USD)", REACH SVHC="No SVHC", Resistance=220R, Stock 1=5843995, Supplier 1=Digi-Key, Termination=SMD/SMT, Voltage Rating (DC)=50V, Width=0.031inch
R3: library part RC0402FR-0756KL, "RES 56K OHM 1% 1/16W 0402", Case Code (Imperial)=0402, Case Code (Metric)=1005, LCSC Part Number=C114756, Manufacturer=Yageo, Max Operating Temperature=155°C, Max Power Dissipation=63mW, Min Operating Temperature=-55°C, Package Quantity=1, Power Rating=62.5mW, Resistance Tolerance=1%, Resistor Type="Thick Film", Supplier Part Number 1=3873767, Temperature Coefficient=100ppm/°C, Voltage Rating=50V, Case/Package=0402, Category="Chip SMD Resistors", ComponentLink1Description=https://datasheet.ciiva.com/46412/1018594-46412840.pdf?src-supplier=Element14, ComponentLink1URL=https://datasheet.ciiva.com/46412/1018594-46412840.pdf?src-supplier=Element14, ComponentLink2Description=https://datasheet.ciiva.com/2453/pyu-r-int-thick-7-2453479.pdf?src-supplier=Digi-Key, ComponentLink2URL=https://datasheet.ciiva.com/2453/pyu-r-int-thick-7-2453479.pdf?src-supplier=Digi-Key, ComponentLink3Description=https://datasheet.ciiva.com/2453/pyu-r-int-thick-7-2453480.pdf?src-supplier=Digi-Key, ComponentLink3URL=https://datasheet.ciiva.com/2453/pyu-r-int-thick-7-2453480.pdf?src-supplier=Digi-Key, ComponentLink4Description=https://datasheet.ciiva.com/2453/pyu-r-int-thick-7-2453478.pdf?src-supplier=Digi-Key, ComponentLink4URL=https://datasheet.ciiva.com/2453/pyu-r-int-thick-7-2453478.pdf?src-supplier=Digi-Key, ComponentLink5Description=https://datasheet.ciiva.com/5558/pyu-rc0402-51-rohs-l-6-r-5558279.pdf?src-supplier=Mouser, ComponentLink5URL=https://datasheet.ciiva.com/5558/pyu-rc0402-51-rohs-l-6-r-5558279.pdf?src-supplier=Mouser, ComponentLink6Description=https://datasheet.ciiva.com/7850/1018594-7850045.pdf?src-supplier=Element14, ComponentLink6URL=https://datasheet.ciiva.com/7850/1018594-7850045.pdf?src-supplier=Element14, ComponentLink7Description=https://datasheet.ciiva.com/7850/1018594-7850044.pdf?src-supplier=Element14, ComponentLink7URL=https://datasheet.ciiva.com/7850/1018594-7850044.pdf?src-supplier=Element14, Construction=Rectangular, Depth=0.5mm, Features="Moisture Resistant", Height=0.016inch, Item Type=Resistor, Lead Free="Lead Free", Length=0.039inch, Manufacturer Part Number=RC0402FR-0756KL, Military Standard=Not, Number of Terminations=2, Packaging="Tape and Reel", Pricing 1="10000=0.001, 50000=0.001, 300000=0.0009, 1000000=0.0009, 3000000=0.0008 (USD)", Reach SVHC Compliant=No, RoHS=Yes, RoHS Compliant=Yes, Series=RC, Stock 1=2610000, Supplier 1="Future Electronics", Technology="THICK FILM", Termination=SMD/SMT, Tolerance=1%, Width=0.02inch, Working Voltage=50V
R5 R12: library part RC0603JR-07100KL, "RES 100K OHM 5% 1/10W 0603", Case Code (Imperial)=0603, Case Code (Metric)=1608, LCSC Part Number=C100048, Manufacturer=Yageo, Max Operating Temperature=155°C, Max Power Dissipation=100mW, Min Operating Temperature=-55°C, Resistance=100kR, Resistance Tolerance=5%, Resistor Type="Thick Film", Supplier Part Number 1=311-100KGRCT-ND, Temperature Coefficient=100ppm/°C, Voltage Rating=50V, Case/Package=0603, Category="Chip SMD Resistors", ComponentLink1Description=https://datasheet.ciiva.com/7746/443971-7746424.pdf?src-supplier=Element14, ComponentLink1URL=https://datasheet.ciiva.com/7746/443971-7746424.pdf?src-supplier=Element14, ComponentLink2Description=https://datasheet.ciiva.com/7983/443971-7983686.pdf?src-supplier=Element14, ComponentLink2URL=https://datasheet.ciiva.com/7983/443971-7983686.pdf?src-supplier=Element14, ComponentLink3Description=https://datasheet.ciiva.com/7746/443971-7746423.pdf?src-supplier=Element14, ComponentLink3URL=https://datasheet.ciiva.com/7746/443971-7746423.pdf?src-supplier=Element14, ComponentLink4Description=https://datasheet.ciiva.com/8887/pyu-rc0603-51-rohs-l-4-8887903.pdf?src-supplier=Avnet, ComponentLink4URL=https://datasheet.ciiva.com/8887/pyu-rc0603-51-rohs-l-4-8887903.pdf?src-supplier=Avnet, Contact Plating=Tin,Matte, Features="Moisture Resistant", Item Type=Resistor, Lead Free="Lead Free", Manufacturer Part Number=RC0603JR-07100KL, Number of Pins=2, Number of Terminations=2, Packaging="Tape and Reel", Power Rating=100mW, Pricing 1="1=0.10000, 10=0.02000, 100=0.00800, 1000=0.00360, 2500=0.00312 (USD)", Radiation Hardening=No, REACH SVHC="No SVHC", RoHS=Yes, RoHS Compliant=Yes, Series=RC, Size Code=0603, Stock 1=1210037, Supplier 1=Digi-Key, Termination=SMD/SMT, Tolerance=5%, Voltage Rating (DC)=50V, Width=0.8mm
R7: library part RC0603JR-07330RL, "RES  SMD 330R 100 mW 0603", Case Code (Imperial)=0603, Case Code (Metric)=1608, LCSC Part Number=C105879, Manufacturer=Yageo, Max Operating Temperature=155°C, Max Power Dissipation=100mW, Min Operating Temperature=-55°C, Package Quantity=5000, Resistance Tolerance=5%, Resistor Type="Thick Film", Supplier Part Number 1=311-330GRCT-ND, Temperature Coefficient=100ppm/°C, Voltage Rating=50V, Case/Package=0603, Category="Chip SMD Resistors", Construction=Rectangular, Depth=0.8mm, Features="Moisture Resistant", Height=0.45mm, Lead Free="Lead Free", Length=1.6mm, Manufacturer Part Number=RC0603JR-07330RL, Military Standard=Not, Number of Pins=2, Number of Terminations=2, Packaging="Tape and Reel", Power Rating=100mW, Pricing 1="1=0.10000, 10=0.02000, 100=0.00800, 1000=0.00360, 2500=0.00312 (USD)", REACH SVHC="No SVHC", Resistance=330R, RoHS=Yes, RoHS Compliant=Yes, Series=RC, Size Code=0603, Stock 1=1074593, Supplier 1=Digi-Key, Termination=SMD/SMT, Tolerance=5%, Voltage Rating (DC)=50V, Width=0.8mm
R9: library part RC0603FR-0751RL, "RES SMD 51R 100mW 0603", Case Code (Imperial)=0603, Case Code (Metric)=1608, LCSC Part Number=C114628, Manufacturer=Yageo, Max Operating Temperature=155°C, Max Power Dissipation=100mW, Min Operating Temperature=-55°C, Package Quantity=1, Resistance Tolerance=1%, Resistor Type="Thick Film", Temperature Coefficient=100ppm/°C, Voltage Rating=75V, Voltage Rating (DC)=50V, Case/Package=0603, Category="Chip SMD Resistors", ComponentLink1Description=https://datasheet.ciiva.com/11808/0900766b80f96399-11808142.pdf?src-supplier=RSComponents, ComponentLink1URL=https://datasheet.ciiva.com/11808/0900766b80f96399-11808142.pdf?src-supplier=RSComponents, ComponentLink2Description=https://datasheet.ciiva.com/46395/443971-46395015.pdf?src-supplier=Element14, ComponentLink2URL=https://datasheet.ciiva.com/46395/443971-46395015.pdf?src-supplier=Element14, ComponentLink3Description=https://datasheet.ciiva.com/2454/pyu-r-int-thick-7-2454445.pdf?src-supplier=Digi-Key, ComponentLink3URL=https://datasheet.ciiva.com/2454/pyu-r-int-thick-7-2454445.pdf?src-supplier=Digi-Key, ComponentLink4Description=https://datasheet.ciiva.com/2454/pyu-r-int-thick-7-2454446.pdf?src-supplier=Digi-Key, ComponentLink4URL=https://datasheet.ciiva.com/2454/pyu-r-int-thick-7-2454446.pdf?src-supplier=Digi-Key, ComponentLink5Description=https://datasheet.ciiva.com/2454/pyu-r-int-thick-7-2454444.pdf?src-supplier=Digi-Key, ComponentLink5URL=https://datasheet.ciiva.com/2454/pyu-r-int-thick-7-2454444.pdf?src-supplier=Digi-Key, Contact Plating=Tin,Matte, Depth=0.8mm, Features="Moisture Resistant", Height=0.45mm, Item Type=Resistor, Lead Free="Lead Free", Length=1.6mm, Manufacturer Part Number=RC0603FR-0751RL, Number of Terminations=2, Packaging="Tape and Reel", Power Rating=100mW, Pricing 1="5000=0.00260, 10000=0.00240, 25000=0.00210, 50000=0.00180 (USD)", REACH SVHC="No SVHC", Resistance=51R, RoHS=Yes, RoHS Compliant=Yes, Series=RC, Size Code=0603, Stock 1=70000, Supplier 1="Arrow Electronics", Supplier Part Number 1=RC0603FR-0751RL, Technology="THICK FILM", Termination=SMD/SMT, Tolerance=1%, Weight=7.1E-05oz, Width=0.8mm
R15: library part RC0603FR-071KL, "RES SMD 1K OHM 1% 1/10W 0603", Case Code (Imperial)=0603, Case Code (Metric)=1608, LCSC Part Number=C22548, Manufacturer=Yageo, Max Operating Temperature=155°C, Min Operating Temperature=-55°C, Power Rating=100mW, Resistance=1kR, Supplier Part Number 1=311-1.00KHRDKR-ND, Temperature Coefficient=100ppm/°C, Tolerance=1%, Voltage Rating=50V, Case/Package=0603, ComponentLink1Description=https://www.verical.com/server-webapp/html/getDatasheet?partID=409289&src-supplier=Verical, ComponentLink1URL=https://www.verical.com/server-webapp/html/getDatasheet?partID=409289&src-supplier=Verical, ComponentLink2Description=http://documents.rs-components.com/techlib://itc_doclist_GB.htm?stockno=5048928&src-supplier=RSComponents, ComponentLink2URL=http://documents.rs-components.com/techlib://itc_doclist_GB.htm?stockno=5048928&src-supplier=RSComponents, ComponentLink3Description=http://www.yageo.com/documents/recent/PYu-RC0603_51_RoHS_L_4.pdf?src-supplier=Avnet+Europe, ComponentLink3URL=http://www.yageo.com/documents/recent/PYu-RC0603_51_RoHS_L_4.pdf?src-supplier=Avnet+Europe, ComponentLink4Description=http://www.farnell.com/datasheets/2167052.pdf?src-supplier=Element14, ComponentLink4URL=http://www.farnell.com/datasheets/2167052.pdf?src-supplier=Element14, ComponentLink5Description=http://www.farnell.com/datasheets/1868787.pdf?src-supplier=Element14, ComponentLink5URL=http://www.farnell.com/datasheets/1868787.pdf?src-supplier=Element14, ComponentLink6Description=http://www.yageo.com/documents/recent/PYu-RC_Group_51_RoHS_L_2.pdf?src-supplier=Avnet, ComponentLink6URL=http://www.yageo.com/documents/recent/PYu-RC_Group_51_RoHS_L_2.pdf?src-supplier=Avnet, ComponentLink7Description=https://www.verical.com/server-webapp/html/getDatasheet?partID=404327&src-supplier=Verical, ComponentLink7URL=https://www.verical.com/server-webapp/html/getDatasheet?partID=404327&src-supplier=Verical, ComponentLink8Description=http://www.farnell.com/datasheets/443971.pdf?src-supplier=Element14, ComponentLink8URL=http://www.farnell.com/datasheets/443971.pdf?src-supplier=Element14, Composition="Thick Film", Contact Plating=Tin,Matte, Depth=0.8mm, Height=0.45mm, Item Type=Resistor, Lead Free="Lead Free", Length=1.6mm, Manufacturer Part Number=RC0603FR-071KL, Military Standard=Not, Packaging="Tape and Reel", Pricing 1="1=0.1, 10=0.023, 100=0.0094, 1000=0.0042, 2500=0.0037 (USD)", Radiation Hardening=No, REACH SVHC="No SVHC", Stock 1=21472395, Supplier 1=Digi-Key, Termination=SMD/SMT
SW1: "50mA Lying SPST 24V Plugin Tactile Switches ROHS", Manufacturer="TE Connectivity", Category="Pushbutton Switches", ComponentLink1Description=https://datasheet.ciiva.com/30072/eng-cd-1825027-f-30072833.pdf?src-supplier=Onlinecomponents.com, ComponentLink1URL=https://datasheet.ciiva.com/30072/eng-cd-1825027-f-30072833.pdf?src-supplier=Onlinecomponents.com, ComponentLink2Description=https://datasheet.ciiva.com/16393/1825027-8-16393346.pdf?src-supplier=Future+Electronics, ComponentLink2URL=https://datasheet.ciiva.com/16393/1825027-8-16393346.pdf?src-supplier=Future+Electronics, ComponentLink3Description=https://datasheet.ciiva.com/8164/eng-cd-1825027-g4-8164921.pdf?src-supplier=Avnet, ComponentLink3URL=https://datasheet.ciiva.com/8164/eng-cd-1825027-g4-8164921.pdf?src-supplier=Avnet, Manufacturer Part Number=1825027-8, Pricing 1="1=0.13800, 10=0.13370, 25=0.12590, 100=0.10940, 250=0.10570, 500=0.09520, 1000=0.07320, 2500=0.07250, 5000=0.06250 (USD)", RoHS=Yes, Stock 1=178529, Supplier 1="Arrow Electronics", Supplier Part Number 1=1825027-8
SW2 SW5: "50mA Brick nogging SPST 100MΩ 1000000 times 250gf@±30gf 12V SMD Tactile Switches ROHS", LCSC Part Number=C83206, Manufacturer="Korean Hroparts Elec", Package=SMD, ComponentLink1Description=LCSC, ComponentLink1URL=https://www.lcsc.com/product-detail/Tactile-Switches_Korean-Hroparts-Elec-K2-6639SP-C4SC-04_C83206.html, Item Type="Tactile Switch", Manufacturer Part Number=K2-6639SP-C4SC-04
SW3: "No NO 50mA 100MΩ 100000 Times 12V 130gf@±30gf Brick nogging SPST SMD Tactile Switches ROHS", LCSC Part Number=C963229, Manufacturer=G-Switch, Package=SMD, ComponentLink1Description=LCSC, ComponentLink1URL=https://www.lcsc.com/product-detail/Tactile-Switches_G-Switch-GT-TC074E-H080-L1_C963229.html, Item Type="Tactile Switch", Manufacturer Part Number=GT-TC074E-H080-L1
U1: "ESOP-8 Battery Management ICs ROHS", LCSC Part Number=C16581, Manufacturer=TOPPOWER, Package=ESOP-8, ComponentLink1Description=LCSC, ComponentLink1URL=https://www.lcsc.com/product-detail/Battery-Management-ICs_TOPPOWER-Nanjing-Extension-Microelectronics-TP4056-42-ESOP8_C16581.html, Item Type=Mosfet, Manufacturer Part Number=TP4056-42-ESOP8
U3: "500-MA, LOW-NOISE, LOW-IQ, HIGH", LCSC Part Number=C3019997, Manufacturer="Texas Instruments", Package=Custom, ComponentLink1Description=LCSC, ComponentLink1URL=https://www.lcsc.com/product-detail/Linear-Voltage-Regulators-LDO_Texas-Instruments-TPS7A2133PYWDJ_C3019997.html, Item Type=IC, Manufacturer Part Number=TPS7A2133PYWDJ
U6: "SMD MODULE W/PCB ANT ESP-U4WDH", LCSC Part Number=C2980305, Manufacturer="Espressif Systems", Supplier Part Number 1=356-ESP32-MINI1PH3Q0, ComponentLink1Description=LCSC, ComponentLink1URL=https://www.lcsc.com/product-detail/WiFi-Modules_Espressif-Systems-ESP32-MINI-1-N4_C2980305.html, Item Type=Module, Manufacturer Part Number=ESP32-MINI-1-N4, Pricing 1="1=2.48000, 10=2.48000, 50=2.48000, 100=2.48000, 1000=2.48000, 10000=2.48000 (USD)", RoHS=No, Stock 1=5903, Supplier 1=Mouser

## Free pads (board coordinates)
  round 2.6 hole 2 mask+0.05: MH(0,0) MH(10,63) MH(70,63) MH(80,0)

## Via types
v1: diameter 0.6, hole 0.3, Top Layer to Bottom Layer, 64 vias

## Nets (pads, with @x,y where several pads share a name; then routed paths per layer and width w, separated by ;. In a path a pad name is that pad's centre, name@x,y a point inside that pad or via, vN(x,y) a via of type N, cw(c..) or ccw(c..) an arc to the next point about the centre after c; other vN are vias at no path point)
3.3V: C12.2 C13.2 C18.2 C27.2 J3.1 Q1.1 R4.1 R8.1 R9.2 R10.1 R11.2 R13.1 U3.A2 U6.3 | length 22.9
  Top Layer w0.508: v1(41.808,1.143) 57.307,1.143 v1(61.76,-3.31)
  Bottom Layer w0.381: U6.3 U6.3@75.865,35.964 ; C18.2@75.865,34.211 C18.2@75.869,34.208 ; C18.2@75.865,34.465 C18.2
  Bottom Layer w0.508: R4.1 v1(41.808,1.143)
  other v1: 72.062,7.093 73.075,7.093 71.885,32.004 72.898,32.004 66.097,35.255 62.738,36.12 62.738,36.984 64.921,45.013 64.921,46.209 65.734,56.775 66.648,56.775
5VCC: C10.2 C11.2 C14.2 C15.2 C16.2 C17.2 D3.1 FB1.1 LED4.1 LED5.1 LED6.1 LED7.1 LED8.1 LED9.1 Q2.1 R12.2 R14.1 | length 9.2
  Bottom Layer w0.508: v1(53.823,32.309) 53.837,32.323 62.952,32.323 R14.1
  other v1: 36.492,11.278 39.014,11.278 41.427,11.278 43.688,11.278
5VDC: C6.2 F1.2 FB1.2 R2.2 R3.2 R7.2 U1.4 U1.8
  other v1: 25.531,3.483 61.773,4.318 25.531,4.352 23.914,5.22 25.531,5.22 24.65,5.263 61.773,6.299 61.773,8.28 61.773,10.49
5VIN: C3.2 C5.2 D1.2 F1.1 J1.4
  other v1: 16.662,-3.175 19.32,-3.175 16.662,-1.273 19.32,-1.273
BATT: C2.2 C4.2 C9.2 J2.2 Q2.2 U1.5
BUTTON: C1.2 R4.2 SW1.2 U6.11 | length 78.1
  Top Layer w0.508: v1(41.199,-1.016) 44.577,-4.394 65.1,-4.394 69.462,-0.033 v1(69.462,29.693)
  Bottom Layer w0.381: v1(69.462,29.693) U6.11
  Bottom Layer w0.508: SW1.2 36.48,-6.598 37.236,-5.842 37.236,-2.692 38.9,-1.029 C1.2 40.291,-1.022 41.192,-1.022 v1(41.199,-1.016)
CHRG: LED2.2 U1.7 | length 19
  Bottom Layer w0.508: U1.7 62.965,23.222 63.905,24.162 77.043,24.162 78.068,23.137 LED2.2
DIN: Q1.2 R13.2 U6.13 | length 2.9
  Bottom Layer w0.381: Q1.2@67.862,33.026 67.862,34.347 U6.13
DIN#: LED4.4 R15.2 | length 31.7
  Top Layer w0.508: LED4.4 36.837,36.651 v1(37.419,36.986)
  Bottom Layer w0.508: v1(37.419,36.986) 37.419,32.762 39.167,31.013 R15.2
DOUT1: LED4.2 LED5.4 | length 7.8
  Top Layer w0.508: LED5.4@28.367,27.5 28.367,28.991 cw(c29.683,28.991) 28.753,29.921 cw(c29.469,29.205) 29.469,30.218 31.878,30.218 ccw(c31.878,32.758) 33.674,30.962 LED4.2
DOUT2: LED5.2 LED6.4 | length 6.5
  Top Layer w0.508: LED5.2@31.667,22.5 31.667,17.063 ccw(c32.977,17.063) LED6.4
DOUT3: LED6.2 LED7.4 | length 6.6
  Top Layer w0.508: LED6.2 38.131,16.495 cw(c38.131,13.955) 39.927,15.751 41.254,14.424 ccw(c43.05,16.22) 43.05,13.68 LED7.4
DOUT4: LED7.2 LED8.4 | length 7.5
  Top Layer w0.508: LED7.2 46.429,19.093 cw(c48.225,17.297) 48.225,19.837 49.8,19.837 ccw(c49.8,22.005) 51.333,20.472 ccw(c50.569,21.237) 51.65,21.237 LED8.4
DOUT5: LED8.2 LED9.4 | length 6.6
  Top Layer w0.508: LED9.4 cw(c47.896,33.74) 48.35,33.74 LED8.2
EN: C19.1 C20.2 J3.6 R8.2 SW2.3 SW2.4 U6.8 | length 66.5
  Top Layer w0.508: v1(43.764,58.369) 43.764,63.856 45.302,65.394 v1(54.362,65.394) 60.311,65.394 75.062,50.643 75.062,36.725 v1(72.862,34.525)
  Bottom Layer w0.381: R8.2@71.862,34.525 U6.8
  Bottom Layer w0.508: v1(54.362,65.394) J3.6
  Bottom Layer w0.635: R8.2 C19.1 71.862,34.525 v1(72.862,34.525)
GND: C1.1 C2.1 C3.1 C4.1 C5.1 C6.1 C7.1 C8.1 C9.1 C10.1 C11.1 C12.1 C13.1 C14.1 C15.1 C16.1 C17.1 C18.1 C19.2 C20.1 C25.1 C26.1 C27.1 D1.1 J1.2 J2.1 J2.MP1 J2.MP2 J3.2 J3.MP1 J3.MP2 LED4.3 LED5.3 LED6.3 LED7.3 LED8.3 LED9.3 pad.MH R1.2 R5.1 R12.1 SW1.1 SW1.3 SW1.4 SW2.1 SW2.2 SW3.1 SW3.2 SW5.1 SW5.2 U1.1 U1.3 U1.9 U3.B2 U6.1 U6.2 U6.27 U6.38 U6.39 U6.40 U6.41 U6.42 U6.43 U6.44 U6.45 U6.46 U6.47 U6.48 U6.49 U6.50 U6.51 U6.52 U6.53 U6.54 U6.55 U6.56 U6.57 U6.58 U6.59 U6.60 U6.61 U6.62 U6.63 | length 12.1
  Top Layer w0.254: C26.1@35.012,24.683 C26.1
  Top Layer w0.508: C14.1@29.599,20.688 v1(29.599,21.311) ; C10.1 cw(c31.172,31.386) 30.919,31.827 v1(31.502,32.163) ; v1(35.012,23.813) C26.1@35.012,24.683 ; v1@37.824,14.23 38.485,13.848 C16.1@38.76,13.69 ; C17.1 v1(42.237,36.128) ; v1(48.422,17.805) C11.1@49.244,18.256 ; C15.1 v1(50.457,28.276)
  Bottom Layer w0.508: U6.62 U6.59 ; U6.58 U6.59 ; U6.60@72.662,43.113 U6.59 ; U6.56 U6.59
  other v1: 5.156,-7.341 7.033,-7.341 8.992,-7.341 5.156,-5.603 8.992,-5.603 61.443,-1.956 37.82,14.247 61.086,17.964 63.575,17.964 62.33,18.67 61.086,19.412 63.575,19.412 50.444,22.352 45.287,24.248 72.662,41.117 71.912,41.867 73.412,41.867 72.662,42.617 38.532,53.34 38.532,57.81
IO0: C25.2 J3.5 R11.1 SW5.3 SW5.4 U6.21 | length 78.7
  Bottom Layer w0.381: 30.14,43.647 28.828,44.959 28.828,57.301 29.997,58.471 33.202,58.471 ; 30.167,43.62 55.1,43.62 56.258,44.778 ; J3.5 56.258,44.778 ; U6.21 R11.1 57.022,42.267 56.258,43.03 56.258,44.778
IOT_BUT: C26.2 R10.2 SW3.3 SW3.4 U6.14 | length 38.2
  Top Layer w0.635: SW3.4 SW3.3 v1@43.375,32.215
  Bottom Layer w0.635: v1(43.358,32.233) 45.028,33.903 63.697,33.903 64.948,35.154 R10.2@64.948,36.538 ; R10.2@65.013,36.667 U6.14
ISET: R1.1 U1.2 | length 2
  Bottom Layer w0.508: R1.1 U1.2
JACK_DET: R3.1 R5.2 U6.12 | length 75
  Bottom Layer w0.381: 22.454,5.025 22.454,5.664 22.454,27.28 25.155,29.981 67.617,29.981 68.662,31.026 U6.12
LED: LED3.2 U6.30 | length 2
  Bottom Layer w0.381: U6.30 LED3.2
NetLED1_1: LED1.1 R2.1 | length 1.4
  Bottom Layer w0.508: R2.1 76.564,19.793 76.568,19.789 LED1.1
NetLED2_1: LED2.1 R7.1 | length 1.4
  Bottom Layer w0.508: R7.1 LED2.1
NetLED3_1: LED3.1 R9.1 | length 1.5
  Bottom Layer w0.508: R9.1 LED3.1
NetQ1_3: Q1.3 R14.2 R15.1
NetR6_1: R6.1 U3.B1
RXD: J3.4 U6.35 | length 32.4
  Bottom Layer w0.381: J3.4 57.258,54.756 58.674,53.34 72.39,53.34 73.462,52.268 U6.35
STDBY: LED1.2 U1.6 | length 29.8
  Bottom Layer w0.508: U1.6 61.695,23.451 63.321,25.076 78.717,25.076 80.012,23.781 80.012,18.77 79.538,18.296 78.515,18.296 78.068,18.743 LED1.2
TXD: J3.3 U6.36 | length 32.2
  Bottom Layer w0.381: J3.3 58.258,55.178 59.131,54.305 72.644,54.305 74.262,52.688 U6.36
VIN: C7.2 C8.2 D3.2 Q2.3 R6.2 U3.A1
pads on no net: J1.3 J1.MH LED9.2 U6.4 U6.5 U6.6 U6.7 U6.9 U6.10 U6.15 U6.16 U6.17 U6.18 U6.19 U6.20 U6.22 U6.23 U6.24 U6.25 U6.26 U6.28 U6.29 U6.31 U6.32 U6.33 U6.34 U6.37